# EAGLE board Uzebox Game Console V5_1 (EAGLE 9.6.2)
V1.3.0: Added Uzenet interface. ESP-12 and SPI RAM. V1.3.1: Fix for ESP-12. Added missing routing between GND and GPIO15. V1.3.2: Fix for SPI RAM instability. Connected pin7 (/HOLD) to VCC.
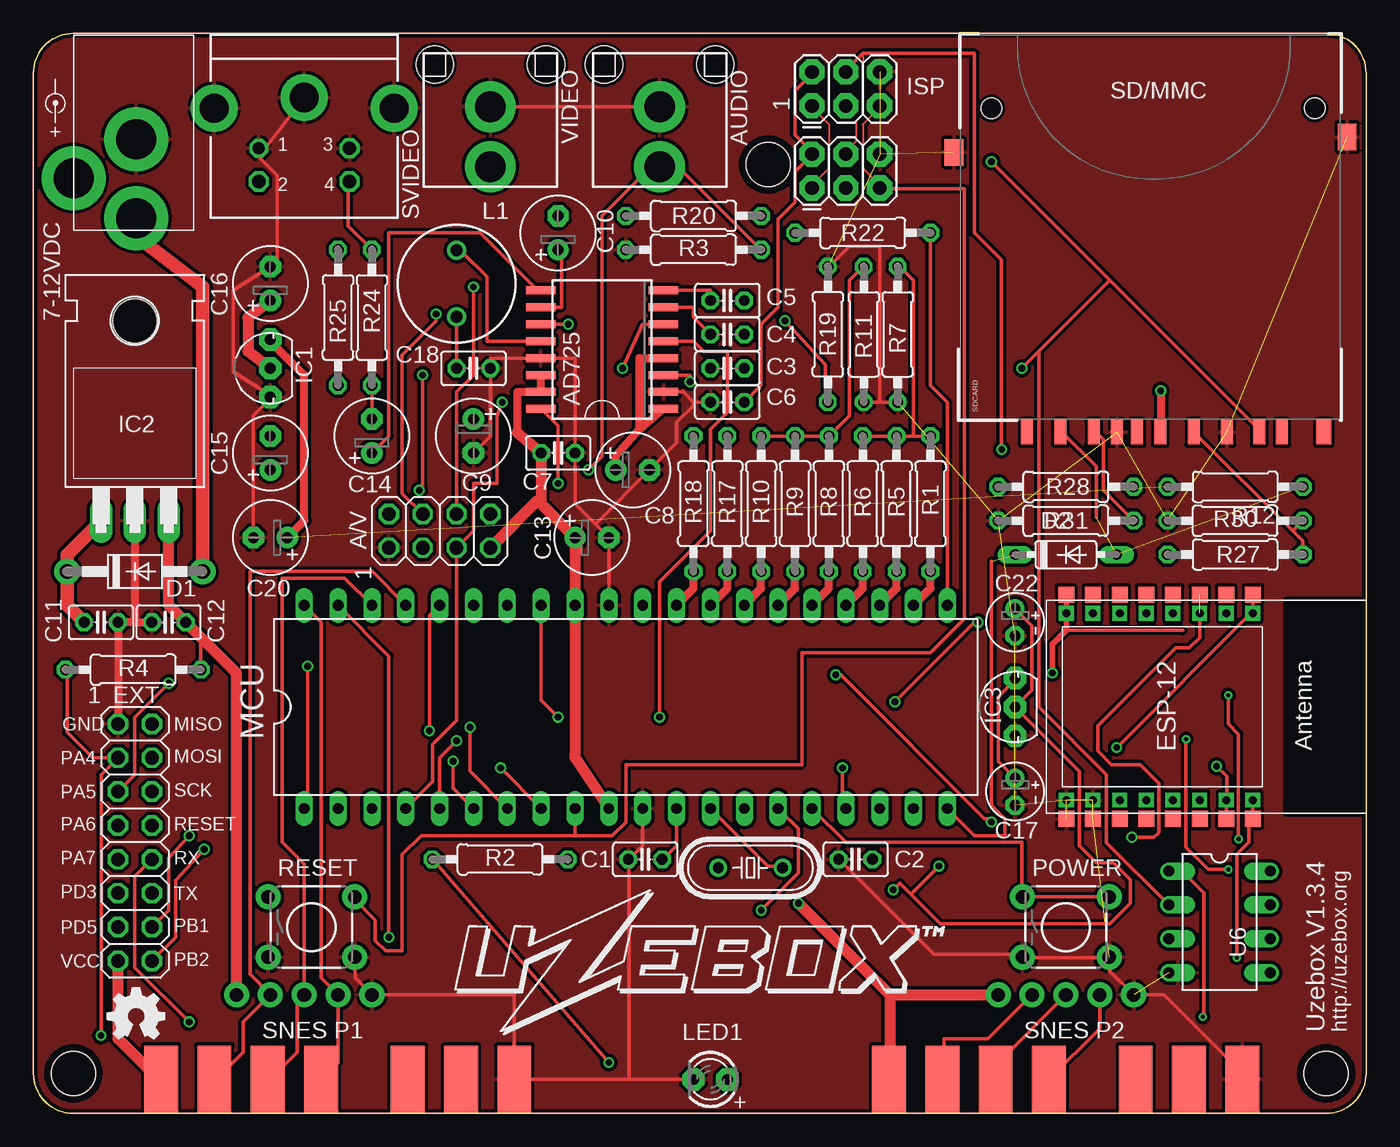
[diagram p0: board, top side]
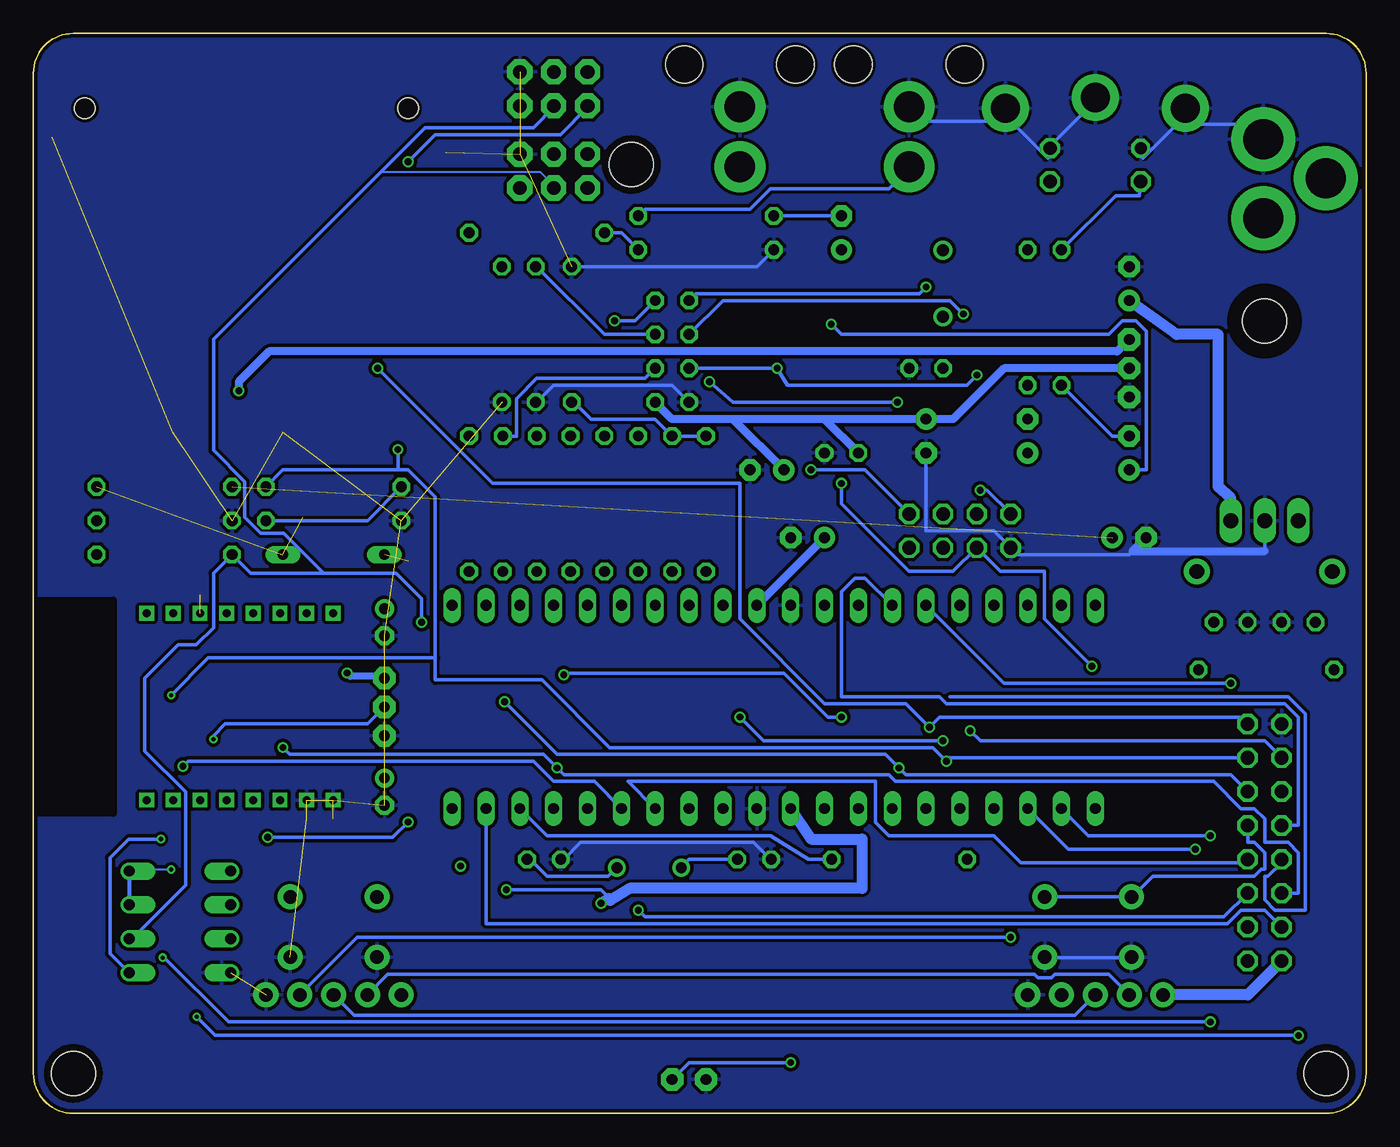
[diagram p1: board, bottom side, seen from below]

Size 100 x 81 mm. Coordinates in mm from the lower left corner, seen from the top.
Outline: 3,0 arc-90 0,3 0,78 arc-90 3,81 97,81 arc-90 100,78 100,3 arc-90 97,0 3,0
Copper layers (1*16): Top 0.035mm / dielectric 1.5mm / Bottom 0.035mm
Design rules "ITEADstudio_DRC": minimum track width 6mil, minimum drill 12mil, track to track 6mil, track to pad 6mil, pad to pad 6mil, via to via 6mil, smd to smd 0mil, copper to edge 10mil, drill to drill 10mil, minimum pad ring 10mil, minimum via ring 6mil, stop-mask expansion 2mil, vias tented up to drill 100mil, thermal gap 10mil

## Footprints (pad centres in the part's own frame; a part is rotated, then mirrored left to right if it is on the bottom)
2X04 = drill 1.016 octagon: 1 -3.81,-1.27; 2 -3.81,1.27; 3 -1.27,-1.27; 4 -1.27,1.27; 5 1.27,-1.27; 6 1.27,1.27; 7 3.81,-1.27; 8 3.81,1.27
SO16W = smd 0.6 x 2.2: 1 -4.445,-4.6; 2 -3.175,-4.6; 3 -1.905,-4.6; 4 -0.635,-4.6; 5 0.635,-4.6; 6 1.905,-4.6; 7 3.175,-4.6; 8 4.445,-4.6; 9 4.445,4.6; 10 3.175,4.6; 11 1.905,4.6; 12 0.635,4.6; 13 -0.635,4.6; 14 -1.905,4.6; 15 -3.175,4.6; 16 -4.445,4.6
RCA = drill 2.3 pad 3.81: GND 0,0; SIG 0,-4.5 | hole 2.8: -4.175,3.15; 4.175,3.15
C025-025X050 = drill 0.813 octagon: 1 -1.27,0; 2 1.27,0
E2,5-6 = drill 0.813 pad 1.6: + -1.27,0 | drill 0.813 pad 1.6 octagon: - 1.27,0
E2-4 = drill 0.813 pad 1.422: + -1.016,0 | drill 0.813 pad 1.422 octagon: - 1.016,0
DO41-10 = drill 1.118 pad 1.93: A 5.08,0; C -5.08,0
DO35-7 = drill 0.813 long: A 3.81,0; C -3.81,0
UZEBOX_ESP-12_TH = smd 1.2 x 1.2: 1 -8.4,4.5; 2 -8.4,2.5; 3 -8.4,0.5; 4 -8.4,-1.5; 5 -8.4,-3.5; 6 -8.4,-5.5; 8 -8.4,-9.5; 9 8.4,-9.5; 10 8.4,-7.5; 11 8.4,-5.5; 12 8.4,-3.5; 13 8.4,-1.5; 14 8.4,0.5; 15 8.4,2.5; 16 8.4,4.5 | smd 1.22 x 1.2: 7 -8.4,-7.5 | drill 0.6 square: P$1 -7,4.5; P$2 -7,2.5; P$3 -7,0.5; P$4 -7,-1.5; P$5 -7,-3.5; P$6 -7,-5.5; P$7 -7,-7.5; P$8 -7,-9.5; P$9 7,-9.5; P$10 7,-7.5; P$11 7,-5.5; P$12 7,-3.5; P$13 7,-1.5; P$14 7,0.5; P$15 7,2.5; P$16 7,4.5
2X08 = drill 1.016 octagon: 1 -8.89,-1.27; 2 -8.89,1.27; 3 -6.35,-1.27; 4 -6.35,1.27; 5 -3.81,-1.27; 6 -3.81,1.27; 7 -1.27,-1.27; 8 -1.27,1.27; 9 1.27,-1.27; 10 1.27,1.27; 11 3.81,-1.27; 12 3.81,1.27; 13 6.35,-1.27; 14 6.35,1.27; 15 8.89,-1.27; 16 8.89,1.27
TO92-INLINE = drill 0.813 pad 1.676 octagon: 1 -2.159,0; 2 0,0; 3 2.159,0
TO220H = drill 1.118 long: 1 -2.54,-10.16; 2 0,-10.16; 3 2.54,-10.16 | hole 3.302: 0,4.826
2X3 = drill 1.016 pad 1.88 octagon: 1 0,0; 2 0,2.54; 3 2.54,0; 4 2.54,2.54; 5 5.08,0; 6 5.08,2.54
1X05 = drill 1.016 pad 1.88: 1 0,0; 2 2.54,0; 3 5.08,0; 4 7.62,0; 5 10.16,0
6000-XXXX-RC = drill 0.9 pad 1.422: 1 -2.5,0; 2 2.5,0
LED3MM = drill 0.813 pad 1.676 octagon: A -1.27,0; K 1.27,0
DIL40 = drill 0.813 long: 1 -24.13,-7.62; 2 -21.59,-7.62; 3 -19.05,-7.62; 4 -16.51,-7.62; 5 -13.97,-7.62; 6 -11.43,-7.62; 7 -8.89,-7.62; 8 -6.35,-7.62; 9 -3.81,-7.62; 10 -1.27,-7.62; 11 1.27,-7.62; 12 3.81,-7.62; 13 6.35,-7.62; 14 8.89,-7.62; 15 11.43,-7.62; 16 13.97,-7.62; 17 16.51,-7.62; 18 19.05,-7.62; 19 21.59,-7.62; 20 24.13,-7.62; 21 24.13,7.62; 22 21.59,7.62; 23 19.05,7.62; 24 16.51,7.62; 25 13.97,7.62; 26 11.43,7.62; 27 8.89,7.62; 28 6.35,7.62; 29 3.81,7.62; 30 1.27,7.62; 31 -1.27,7.62; 32 -3.81,7.62; 33 -6.35,7.62; 34 -8.89,7.62; 35 -11.43,7.62; 36 -13.97,7.62; 37 -16.51,7.62; 38 -19.05,7.62; 39 -21.59,7.62; 40 -24.13,7.62
TACTILE-PTH = drill 1.016 pad 1.88: 1 -3.251,2.261; 2 3.251,2.261; 3 -3.251,-2.261; 4 3.251,-2.261
0207/10 = drill 0.813 octagon: 1 -5.08,0; 2 5.08,0
SDCARD_4UCONN = smd 1.8 x 0.9: 1 -1,6.77; 2 -1,4.27; 3 -1,2.52; 4 -1,-0.73; 5 -1,-3.23; 6 -1,-5.73; 7 -1,-8.15; 8 -1,-9.85; 9 -1,9.27; CD -1,1.02 | smd 2 x 1.4: SH@1 20,14.75; SH@2 21.15,-14.75 | smd 1.8 x 1.1: WP -1,-13 | hole 1.55: 23.3,11.94; 23.3,-12.32
SNES_CONNECTOR = smd 2.54 x 5.08: P$8 -12,2.54; P$9 -8,2.54; P$10 -4,2.54; P$11 0,2.54; P$12 6.5,2.54; P$13 10.5,2.54; P$14 14.5,2.54
MINIDIN4 = drill 0.9 octagon: 1 -3.4,-3.8 | drill 1 octagon: 2 3.4,-3.8; 3 -3.4,-6.3; 4 3.4,-6.3 | drill 2.2 pad 3.5: GND1 -6.75,-0.8; GND2 0,0; GND3 6.75,-0.8
PJ-102A = drill 3 pad 4.8: RING 0.1,-3.39; RING_SW -4.6,-6.29; TIP 0.1,-9.29
DIL08 = drill 0.813 offset: 1 -5.08,-5.08; 2 -2.54,-5.08; 3 0,-5.08; 4 2.54,-5.08; 5 2.54,2.54; 6 0,2.54; 7 -2.54,2.54; 8 -5.08,2.54
STAND-OFF = hole 3.302: 0,0
HC49/S = drill 0.813: 1 -2.413,0; 2 2.413,0

## Placement (x,y rotation side)
A/V  [2X04]  30.48,43.69 0 top
AD725  AD725  [SO16W]  42.67,57.28 90 top
AUDIO  RCA  [RCA]  46.99,75.5 0 top
C1  18pF  [C025-025X050]  45.91,19.05 180 top
C2  18pF  [C025-025X050]  61.69,19.05 180 top
C3  100nF  [C025-025X050]  52.07,55.88 180 top
C4  100nF  [C025-025X050]  52.07,58.42 180 top
C5  100nF  [C025-025X050]  52.07,60.96 180 top
C6  100nF  [C025-025X050]  52.07,53.34 180 top
C7  100nF  [C025-025X050]  39.37,49.53 0 top
C8  10uF  [E2,5-6]  44.96,48.26 0 top
C9  10uF  [E2,5-6]  33.02,50.8 270 top
C10  220uF  [E2,5-6]  39.37,66.04 90 top
C11  330nF  [C025-025X050]  5.08,36.83 0 top
C12  100nF  [C025-025X050]  10.16,36.83 180 top
C13  10uF  [E2,5-6]  41.91,43.18 0 top
C14  220uF  [E2,5-6]  25.4,50.8 90 top
C15  220uF  [E2,5-6]  17.78,49.53 90 top
C16  1uF  [E2,5-6]  17.78,62.23 90 top
C17  1uF  [E2-4]  73.66,24.13 270 top
C18  18pF  [C025-025X050]  33.02,55.88 0 top
C20  1uF  [E2,5-6]  17.78,43.18 180 top
C22  1uF  [E2-4]  73.66,36.83 270 top
D1  1N4001  [DO41-10]  7.62,40.64 0 top
D2  BAT85  [DO35-7]  77.47,41.91 0 top
ESP-12  ESP-12  [UZEBOX_ESP-12_TH]  87,30.5 270 top
EXT  [2X08]  7.62,20.32 270 top
IC1  MCP1700  [TO92-INLINE]  17.78,55.88 90 top
IC2  7805T  [TO220H]  7.62,54.61 0 top
IC3  MCP1700  [TO92-INLINE]  73.66,30.48 90 top
ISP  [2X3]  58.42,75.56 0 top
ISP-90DEG  (optional)  [2X3]  58.42,69.4 0 top
JP4  [1X05]  15.24,8.89 0 top
JP5  [1X05]  72.39,8.89 0 top
L1  68uH  [6000-XXXX-RC]  31.75,62.23 270 top
LED1  P607-ND  [LED3MM]  50.8,2.54 180 top
MCU  MEGA164P/324P/644P-PU  [DIL40]  44.45,30.48 0 top
POWER  USER  [TACTILE-PTH]  77.47,13.97 0 top
R1  3.16K  [0207/10]  67.31,45.72 90 top
R2  301  [0207/10]  35.02,19.05 0 top
R3  806  [0207/10]  49.53,64.77 0 top
R4  3.16K  [0207/10]  7.49,33.27 0 top
R5  1.58K  [0207/10]  64.77,45.72 90 top
R6  806  [0207/10]  62.23,45.72 90 top
R7  75  [0207/10]  64.85,58.42 270 top
R8  3.16k  [0207/10]  59.69,45.72 90 top
R9  1.58k  [0207/10]  57.15,45.72 90 top
R10  806  [0207/10]  54.61,45.72 90 top
R11  75  [0207/10]  62.31,58.42 270 top
R12  3.16K  [0207/10]  90.17,46.99 180 top
R17  1.58k  [0207/10]  52.07,45.72 90 top
R18  806  [0207/10]  49.53,45.72 90 top
R19  75  [0207/10]  59.61,58.42 90 top
R20  75  [0207/10]  49.53,67.31 0 top
R22  3.16K  [0207/10]  62.23,66.04 0 top
R24  75  [0207/10]  25.4,59.69 270 top
R25  75  [0207/10]  22.86,59.69 270 top
R27  301  [0207/10]  90.17,41.91 180 top
R28  301  [0207/10]  77.47,46.99 0 top
R30  562  [0207/10]  90.17,44.45 0 top
R31  562  [0207/10]  77.47,44.45 0 top
RESET  RESET  [TACTILE-PTH]  20.86,13.97 0 top
SDCARD  SD_CARD_SOCKET4UCON  [SDCARD_4UCONN]  83.82,52.07 90 top
SNES_P1  SNES Player 1  [SNES_CONNECTOR]  21.59,0 0 top
SNES_P2  SNES Player 2  [SNES_CONNECTOR]  76.2,0 0 top
SVIDEO  S-VIDEO OUT  [MINIDIN4]  20.32,76.18 0 top
U5  DC IN  [PJ-102A]  7.62,76.44 0 top
U6  23LC1024  [DIL08]  90.27,13.1 270 top
U$1  [OSHW_FILLX150_NOTEXT]  5.59,5.6 0 top
U$2  [STAND-OFF]  3,3 0 top
U$3  [STAND-OFF]  97,3 180 top
U$4  [STAND-OFF]  55.14,71.15 0 top
U$6  [LOGO]  40.91,12 0 top
U$7  [POWER]  1.65,76.71 270 top
U$8  [BUMPON]  5.79,59.85 0 top
U$9  [BUMPON]  6.05,5.92 0 top
U$10  [BUMPON]  96.84,6.06 0 top
U$11  [BUMPON]  93.83,73.83 0 top
VIDEO  RCA  [RCA]  34.29,75.5 0 top
XTAL  28.63636Mhz  [HC49/S]  53.8,18.41 180 top

## Library data of the parts
A/V EXT = pinhead
AD725 = ad725; IC_NO: U2
AUDIO = rca; PN: CP-1420-ND
C1 C2 C6 C7 C11 C12 C18 R1-R12 R17-R20 R22 R24 R25 R27 R28 R30 R31 = resistor
C3-C5 C8-C10 C13-C16 C20 = rcl; SPICEPREFIX: C
C17 C22 D2 LED1 = adafruit
D1 = adafruit; PN: 641-1310-1-ND
ESP-12 = Uzebox Portable V2
IC1 IC3 = adafruit; DPN: MCP1700-3302E/TO-ND
IC2 = adafruit; DPN: LM7805ACT-ND
ISP ISP-90DEG = SparkFun; PN: 609-2436-ND
JP4 JP5 U$2-U$4 = SparkFun
L1 = rcl; SPICEPREFIX: L
MCU = avr-5
POWER RESET = SparkFun; PN: P8006S-ND
SDCARD = SparkFun-Connectors
SNES_P1 SNES_P2 U6 U$6-U$11 = uzebox
SVIDEO = uzebox; PN: CP-2240-ND
U5 = adafruit; LABEL: DC IN (9-12V)
U$1 = ohw-logo
VIDEO = rca; PN: CP-1421-ND
XTAL = crystal; OC_FARNELL: 1667008; OC_NEWARK: unknown; PN: 887-1256-ND

## Nets
3V3_ESP: C17.+ ESP-12.8 ESP-12.P$8 IC3.3
+3V3: C20.+ IC1.3 R12.2 SDCARD.4
+5V: A/V.7 AD725.1 AD725.4 AD725.14 AD725.15 C6.1 C7.1 C8.+ C9.+ C12.1 C13.+ C16.+ C22.+ EXT.15 IC1.2 IC2.3 IC3.2 ISP-90DEG.2 ISP.2 JP4.1 JP5.1 MCU.10 MCU.30 MCU.32 R4.2 SNES_P1.P$8 SNES_P2.P$8 U6.7 U6.8
AUDIO: A/V.8 AUDIO.SIG R3.2 R22.1
BLUE: A/V.6 AD725.8 C5.2
BLUE1: MCU.28 R17.1
BLUE2: MCU.29 R18.1
ESP_EN: ESP-12.3 ESP-12.P$3 MCU.33
ESP_PROG: EXT.9
ESP_RST: ESP-12.1 ESP-12.P$1 EXT.11 MCU.17
GND: A/V.1 AD725.2 AD725.13 AUDIO.GND C1.2 C2.2 C6.2 C7.2 C8.- C9.- C11.2 C12.2 C13.- C16.- C17.- C18.2 C20.- C22.- ESP-12.9 ESP-12.10 ESP-12.P$9 ESP-12.P$10 EXT.1 IC1.1 IC2.2 IC3.1 ISP-90DEG.6 ISP.6 JP4.5 JP5.5 LED1.K MCU.11 MCU.31 POWER.3 POWER.4 R3.1 R7.2 R11.2 R19.2 R30.1 R31.1 RESET.3 RESET.4 SDCARD.3 SDCARD.6 SDCARD.SH@1 SDCARD.SH@2 SNES_P1.P$14 SNES_P2.P$14 SVIDEO.1 SVIDEO.2 SVIDEO.GND1 SVIDEO.GND2 SVIDEO.GND3 U5.RING U6.4 VIDEO.GND
GREEN: A/V.4 AD725.7 C4.2
GREEN0: MCU.25 R8.1
GREEN1: MCU.26 R9.1
GREEN2: MCU.27 R10.1
MISO: EXT.2 ISP-90DEG.1 ISP.1 MCU.7 SDCARD.7 U6.2
MOSI: EXT.4 ISP-90DEG.4 ISP.4 MCU.6 R28.2 U6.5
MOSI_3V3: R28.1 R31.2 SDCARD.2
N$1: AD725.12 L1.1
N$2: C18.1 L1.2
N$3: C5.1 R17.2 R18.2 R19.1
N$4: C4.1 R8.2 R9.2 R10.2 R11.1
N$5: C3.1 R1.2 R5.2 R6.2 R7.1
N$6: C10.- R20.1
N$7: AD725.10 C10.+
N$8: R20.2 VIDEO.SIG
N$9: C1.1 MCU.12 XTAL.2
N$10: D1.A U5.TIP
N$11: C14.- R24.2
N$12: C2.1 MCU.13 XTAL.1
N$13: MCU.21 R22.2
N$14: U6.3
N$20: C11.1 D1.C IC2.1
N$23: MCU.18 R2.2
N$25: LED1.A R2.1
N$26: C15.- R25.2
N$28: AD725.11 C15.+
N$29: AD725.9 C14.+
N$30: R24.1 SVIDEO.4
N$31: R25.1 SVIDEO.3
PA5: EXT.5 MCU.35
PA6: EXT.7 MCU.34
PB1: EXT.14 MCU.2
PB2: EXT.16 MCU.3
PD5: EXT.13 MCU.19
POWER_SW: MCU.16 POWER.1 POWER.2
RED: A/V.2 AD725.6 C3.2
RED0: MCU.22 R1.1
RED1: MCU.23 R5.1
RED2: MCU.24 R6.1
RESET: EXT.8 ISP-90DEG.5 ISP.5 MCU.9 RESET.1 RESET.2
SCK: EXT.6 ISP-90DEG.3 ISP.3 MCU.8 R27.2 U6.6
SCK_3V3: R27.1 R30.2 SDCARD.5
SD_CE: D2.C MCU.20
SD_CE_3V3: D2.A R12.1 SDCARD.1
SNES_CLK: JP4.2 JP5.2 MCU.37 SNES_P1.P$9 SNES_P2.P$9
SNES_DATA1: JP4.4 MCU.40 SNES_P1.P$11
SNES_DATA2: JP5.4 MCU.39 SNES_P2.P$11
SNES_LATCH: JP4.3 JP5.3 MCU.38 SNES_P1.P$10 SNES_P2.P$10
SPIRAM_EN: EXT.3 MCU.36 R4.1 U6.1
UART_RX: ESP-12.16 ESP-12.P$16 EXT.10 MCU.14
UART_TX: ESP-12.15 ESP-12.P$15 EXT.12 MCU.15
VIDEO_CE: AD725.5 MCU.5
VIDEO_CLK: A/V.5 AD725.3 MCU.4
VIDEO_SYNC: A/V.3 AD725.16 MCU.1

## Tracks (layer width: path | path; a pad name or v marks a point on that pad's centre or on a via)
3V3_ESP  (via drill 0.51)
  Top 0.254: C17.+ 72.39,26.42 72.39,31.24 73.66,32.51 IC3.3 | 86.22,36.23 77.5,36.23
  Top 0.406: v76.45,33.02 76.45,35.18 77.5,36.23 ESP-12.P$8 ESP-12.8
  Bottom 0.254: 76.2,32.77 v76.45,33.02 | 73.66,32.77 IC3.3
  Bottom 0.508: 73.66,32.77 76.2,32.77
+3V3  (via drill 0.51)  (1 unrouted)
  Top 0.254: 17.78,57.91 IC1.3 | 84.58,51.31 SDCARD.4
  Top 0.61: C20.+ 20.32,44.45 20.32,55.37 17.78,57.91 | v84.58,54.2 84.58,51.31
  Bottom 0.61: IC1.3 18.67,57.15 82.3,57.15 84.58,54.86 v84.58,54.2
+5V  (via drill 0.3, 0.51)
  Top 0.152: 58.42,71.88 ISP-90DEG.2 58.42,72.14
  Top 0.254: 64.26,2.54 SNES_P2.P$8 | SNES_P1.P$8 9.4,2.54 | AD725.15 38.1,54.1 | 38.1,55.37 AD725.14 | 47.24,52.83 AD725.1 | C6.1 54.61,54.61 54.61,59.18 55.88,60.45 55.88,67.06 57.15,68.33 57.15,70.61 58.42,71.88 | ISP.2 58.42,77.98 57.15,76.71 57.15,73.41 58.42,72.14 | 40.64,26.92 40.64,26.67 | 38.1,45.97 37.85,45.97 | v64.52,16.76 65.02,17.27 65.85,16.45 | 65.85,16.45 v67.94,18.54 | C22.+ 74.93,36.58 74.93,31.75 IC3.2 78.49,25.65 78.49,20.07 79.76,18.8 81.03,18.8 82.3,17.53 82.3,15.75 80.77,14.22 68.07,14.22 65.85,16.45 | v89.66,18.29 88.14,18.29 86.49,19.94 v86.49,28.07 | R4.2 12.57,35.69 C12.1
  Top 0.61: 38.1,54.1 38.1,55.37 | 36.32,51.05 36.32,54.1 AD725.15 | 45.47,51.31 43.69,49.28 C8.+ | 45.47,51.31 47.24,52.83 | 45.47,51.31 45.47,56.64 AD725.4
  Top 0.813: 64.26,8.89 JP5.1 | 64.26,8.89 64.26,2.54 | 40.64,26.67 MCU.10 | v57.4,15.75 64.26,8.89 | 9.4,2.54 6.35,5.59 EXT.15 | IC2.3 10.16,38.1 C12.1 15.24,33.02 JP4.1 | C16.+ 16.1,59.69 16.1,57.15 IC1.2 | 36.32,51.05 C7.1 38.1,45.97 38.1,45.72 C13.+ MCU.32 40.64,26.92 | 37.85,45.97 A/V.7
  Bottom 0.152: U6.8 92.68,18.18 92.57,18.29 v89.66,18.29
  Bottom 0.254: v64.52,16.76 57.4,16.76 56.9,16.26 56.81,16.12 56.72,15.98 | IC3.2 74.93,29.21 85.6,29.21 86.49,28.32 v86.49,28.07
  Bottom 0.305: U6.8 U6.7
  Bottom 0.61: C6.1 52.07,52.07 47.5,52.07 | 47.5,52.07 C8.+ | 40.64,52.07 47.5,52.07 | 40.64,52.07 C9.+ 30.99,52.07 27.18,55.88 IC1.2 | 40.64,52.07 C7.1 | C13.+ MCU.30
  Bottom 0.813: 56.72,15.98 55.27,16.88 37.83,16.88 37.83,20.57 41.64,20.57 MCU.10 | 56.81,16.12 v57.4,15.75 | EXT.15 8.89,8.89 JP4.1 | IC2.3 10.16,46.16 11.1,47 11.1,58.42 14.24,58.42 C16.+
AUDIO  (via drill 0.51)
  Top 0.254: v41.66,48.26 42.67,49.28 42.67,67.31 46.99,71.63 AUDIO.SIG 46.99,71.37 48.01,71.37 R3.2
  Bottom 0.254: R3.2 55.88,66.04 R22.1 | v41.66,48.26 37.59,48.26 A/V.8
BLUE  (via drill 0.51)
  Top 0.254: AD725.8 50.8,61.72 C5.2 | A/V.6 31.75,54.1 33.02,55.37 v33.02,61.98
  Bottom 0.254: v33.02,61.98 33.53,61.47 50.29,61.47 C5.2
BLUE1
  Top 0.61: MCU.28 52.07,39.37 R17.1
BLUE2
  Top 0.61: MCU.29 49.53,39.37 R18.1
ESP_EN  (via drill 0.51)  (1 unrouted)
  Top 0.152: 84.39,21.02 84.45,21.08
  Top 0.254: 84.39,21.02 84.07,20.7 v82.42,20.7 | v60.2,32.89 60.58,32.89 71.37,22.1 71.63,22.1 v71.88,21.84 | v39.37,29.72 38.1,30.99 MCU.33 | 84.45,21.08 84.45,24.77 83.06,26.16 80.9,26.16 79.88,27.18 79.88,29.08 85.72,34.92 86.74,34.92 87.5,35.68 ESP-12.P$3
  Bottom 0.254: v82.42,20.7 73.03,20.7 v71.88,21.84 | v60.2,32.89 60.07,33.02 43.69,33.02 40.39,29.72 v39.37,29.72
ESP_PROG
  Bottom 0.254: 31.24,31.24 5.84,31.24 4.57,29.97 4.57,15.24 6.86,15.24 7.62,16 7.62,17.78 7.37,17.78 6.35,18.8 EXT.9
ESP_RST  (via drill 0.51)
  Top 0.254: MCU.17 60.71,23.11 v60.71,25.91 | v81.28,27.43 91.35,37.5 ESP-12.P$1 ESP-12.1
  Bottom 0.254: EXT.11 5.08,16.51 5.08,19.56 5.84,20.32 7.62,20.32 7.62,22.1 8.38,22.86 9.4,22.86 11.43,24.89 35.31,24.89 35.81,25.4 60.2,25.4 v60.71,25.91 61.72,26.92 80.77,26.92 v81.28,27.43
GND  (17 unrouted)
  Top 0.254: C9.- 34.29,50.8 C18.2 34.29,56.64 AD725.13 40.64,56.64 C7.2 40.64,45.72 42.16,44.2 | MCU.31 C13.- 42.16,44.2 | 42.16,44.2 C8.- 48.26,50.29 48.26,51.82 49.53,53.09 49.53,53.34 | R7.2 63.5,53.34 | 63.5,53.34 R11.2 | AD725.2 48.77,54.1 49.53,53.34 | C6.2 49.53,53.34 | 63.5,53.34 63.5,65.02 61.21,65.02 59.69,63.5 R19.2 | C20.- 16.51,52.32 17.78,53.59 IC1.1 17.78,53.85 15,55.63 15,61.72 C16.- 18.29,64.01 18.29,70.36 17.02,71.63 | SVIDEO.GND2 17.02,71.88 17.02,71.63 | VIDEO.GND AUDIO.GND | 44.7,19.05 45.72,20.07 MCU.11 | RESET.4 24.13,11.68 24.13,10.16 JP4.5 36.07,8.89 36.07,2.54 SNES_P1.P$14 44.7,2.54 | 44.7,2.54 LED1.K | 44.7,2.54 44.7,19.05 | 44.7,19.05 C1.2 | SNES_P2.P$14 90.68,2.54 90.42,2.79 90.42,3.3 84.84,8.89 JP5.5 80.77,10.67 80.77,11.68 POWER.4 80.52,11.68 74.42,11.68 POWER.3 74.17,11.94 67.56,11.94 60.45,19.05 C2.2 | 17.02,71.63 SVIDEO.1
  Top 0.61: 7.62,36.83 C12.2 | 7.62,36.83 C11.2 EXT.1 | IC2.2 7.62,36.83
  Bottom 0.254: R3.1 45.72,63.5 R19.2 | C6.2 52.07,54.61 60.96,54.61 62.23,53.34 R11.2 | 17.53,42.16 17.78,41.91 26.16,41.91 A/V.1 27.94,43.69 33.02,43.69 C9.- | 7.62,42.16 IC2.2 | SVIDEO.1 16.76,71.63 14.22,74.17 13.72,74.17 SVIDEO.GND1 13.46,74.17 9.4,74.17 7.37,72.14 U5.RING | VIDEO.GND 32.77,74.42 27.18,74.42 SVIDEO.GND3 26.92,74.17 26.42,74.17 23.88,71.63 SVIDEO.2 23.88,72.39 20.32,75.95 SVIDEO.GND2 | C2.2 60.2,19.05 58.93,20.32 45.97,20.32 44.7,19.05 C1.2 | RESET.3 17.78,11.68 23.88,11.68 RESET.4
  Bottom 0.61: C20.- 17.53,42.16 7.62,42.16
  pour Top (isolate 0.254): 0,78 arc-90 3,81 97,81 arc-90 100,78 100,3 arc-90 97,0 3,0 arc-90 0,3
  pour Bottom (isolate 0.254): 0,78 arc-90 3,81 97,81 arc-90 100,78 100,3 arc-90 97,0 3,0 arc-90 0,3
GREEN  (via drill 0.51)
  Top 0.254: AD725.7 49.53,60.45 49.53,59.69 C4.2 | A/V.4 27.69,46.48 27.69,56.9 30.23,59.44 v30.23,59.94
  Bottom 0.254: v30.23,59.94 31.24,60.96 48.26,60.96 C4.2
GREEN0
  Top 0.61: MCU.25 59.69,39.37 R8.1
GREEN1
  Top 0.61: MCU.26 57.15,39.37 R9.1
GREEN2
  Top 0.61: MCU.27 54.61,39.37 R10.1
MISO  (via drill 0.51)
  Top 0.152: ISP-90DEG.1 58.42,69.6 59.69,70.87 59.69,74.17 58.42,75.44 ISP.1
  Top 0.254: MCU.7 32.77,25.65 v32.77,28.96 | v71.88,71.37 80.77,62.48 | 80.77,62.48 91.95,51.31 SDCARD.7 | 80.77,62.48 75.44,57.15 | 75.44,57.15 v74.17,55.88 | 75.44,57.15 75.44,32.77 75.44,30.48 80.52,25.4 80.52,21.08 80.52,20.31 U6.2
  Bottom 0.254: ISP.1 58.42,75.44 60.45,73.41 69.85,73.41 v71.88,71.37 | EXT.2 9.4,29.72 32,29.72 v32.77,28.96 34.54,30.73 40.64,30.73 46.99,37.08 46.99,47.24 65.53,47.24 v74.17,55.88
MOSI  (via drill 0.3, 0.51)
  Top 0.152: 62.23,79.5 62.23,74.93 61.72,74.42 61.72,72.9 60.96,72.14 ISP-90DEG.4
  Top 0.254: MCU.6 31.5,24.38 v31.5,26.42 | v72.64,49.78 72.64,64.01 70.61,66.04 70.61,79.5 62.23,79.5 60.96,78.23 ISP.4 | v89.66,31.37 89.66,29.21 90.42,28.45 v90.42,20.57
  Bottom 0.254: EXT.4 31.24,26.67 v31.5,26.42 32.51,27.43 56.77,27.43 61.85,32.51 69.85,32.51 69.85,34.16 | 72.64,48.26 71.88,48.26 69.85,46.23 69.85,34.16 | 72.64,48.26 v72.64,49.78 | v89.66,31.37 86.87,34.16 69.85,34.16 | R28.2 81.28,48.26 72.64,48.26 | v90.42,20.57 92.84,20.57 94.23,19.18 94.23,11.98 U6.5
MOSI_3V3
  Top 0.254: R31.2 80.26,46.74 80.26,50.55 79.76,51.05 SDCARD.2
  Bottom 0.254: R28.1 74.93,44.45 R31.2
N$1
  Top 0.254: AD725.12 34.04,57.91 34.04,62.74 32.26,64.52 31.75,64.52 L1.1
N$2
  Top 0.254: C18.1 L1.2
N$3  (via drill 0.51)
  Top 0.254: v56.39,59.44 59.44,56.13 59.44,53.34 R19.1
  Bottom 0.254: R18.2 R17.2 53.34,52.07 58.17,52.07 59.44,53.34 R19.1 | C5.1 54.86,59.44 v56.39,59.44
N$4
  Top 0.254: R10.2 R9.2 R8.2 61.21,52.32 61.21,62.48 62.23,63.5 R11.1
  Bottom 0.254: C4.1 57.15,58.42 62.23,63.5 R11.1
N$5
  Top 0.254: R6.2 R5.2 66.04,50.8 | 66.04,50.8 R1.2 | 66.04,50.8 66.04,62.48 65.02,63.5 R7.1
  Bottom 0.254: C3.1 54.1,55.12 62.23,55.12 63.75,53.59 63.75,50.8 R5.2
N$6
  Bottom 0.254: C10.- R20.1
N$7
  Top 0.254: AD725.10 39.62,60.45 39.62,64.52 C10.+
N$8
  Bottom 0.254: R20.2 54.1,67.82 46.23,67.82 44.7,69.34 35.81,69.34 34.29,70.87 VIDEO.SIG
N$9
  Top 0.254: MCU.12 48.26,20.07 47.24,19.05 C1.1
  Bottom 0.254: C1.1 50.8,19.05 51.31,18.54 XTAL.2
N$10
  Top 0.254: 7.37,66.04 U5.TIP
  Top 1.016: D1.A 12.7,61.98 7.37,66.04
N$11
  Top 0.254: C14.- R24.2
N$12
  Top 0.254: MCU.13 55.12,18.54 56.13,18.54 XTAL.1
  Bottom 0.254: C2.1 62.74,19.05 61.47,17.78 56.9,17.78 56.39,18.29 XTAL.1
N$13
  Top 0.254: MCU.21 68.58,53.34 67.31,54.61 R22.2
N$20
  Top 1.016: C11.1 2.54,38.1 D1.C 2.54,41.91 IC2.1
N$23
  Bottom 0.254: R2.2 41.86,19.05 44.69,20.81 44.7,20.83 61.47,20.83 MCU.18
N$25  (via drill 0.51)
  Top 0.254: R2.1 v43.18,3.81
  Bottom 0.254: v43.18,3.81 50.8,3.81 LED1.A
N$26
  Bottom 0.254: R25.2 19.05,50.8 C15.-
N$28  (via drill 0.51)
  Top 0.254: v40.13,59.18 AD725.11
  Bottom 0.254: v40.13,59.18 39.37,58.42 19.3,58.42 18.29,59.44 17.27,59.44 16.51,58.67 16.51,48.26 C15.+
N$29
  Top 0.254: C14.+ 26.67,50.8 26.67,66.04 33.53,66.04 37.85,61.72 AD725.9
N$30
  Top 0.254: R24.1 23.62,66.55 23.62,69.85 SVIDEO.4
N$31
  Bottom 0.254: R25.1 18.8,68.83 17.02,68.83 SVIDEO.3
PA5  (via drill 0.51)
  Top 0.254: v10.16,32.26 7.62,29.72 7.62,25.4 EXT.5
  Bottom 0.254: MCU.35 27.18,32.26 v10.16,32.26
PA6
  Bottom 0.254: MCU.34 37.59,40.13 38.35,40.13 39.37,39.12 39.37,31.24 32,31.24 31.5,30.73 6.1,30.73 5.08,29.72 5.08,21.59 EXT.7
PB1  (via drill 0.51)
  Top 0.254: v11.68,20.83 10.16,19.16 10.16,15.24 EXT.14
  Bottom 0.254: MCU.2 20.83,20.83 v11.68,20.83
PB2  (via drill 0.51)
  Top 0.254: v12.83,19.81 10.67,17.49 10.67,13.21 EXT.16
  Bottom 0.254: MCU.3 22.35,19.81 v12.83,19.81
PD5
  Bottom 0.254: MCU.19 66.04,14.22 10.41,14.22 9.4,15.24 7.62,15.24 EXT.13
POWER_SW
  Top 0.254: MCU.16 60.96,20.32 74.17,20.32 74.17,16.26 POWER.1 74.42,16.26 80.52,16.26 POWER.2
RED  (via drill 0.51)
  Top 0.254: AD725.6 45.72,59.18 v44.2,55.88 | v29.21,55.37 29.21,46.99 v28.96,46.74
  Bottom 0.254: C3.2 v44.2,55.88 43.43,54.61 29.97,54.61 v29.21,55.37 | A/V.2 28.45,46.74 v28.96,46.74
RED0
  Top 0.61: MCU.22 67.31,39.37 R1.1
RED1
  Top 0.61: MCU.23 64.77,39.37 R5.1
RED2
  Top 0.61: MCU.24 62.23,39.37 R6.1
RESET
  Top 0.152: ISP.5 63.5,75.44 62.23,74.17 62.23,70.87 63.5,69.6 ISP-90DEG.5 63.5,69.34
  Top 0.254: 40.64,20.83 43.43,20.83 44.45,21.84 44.45,26.16 57.66,26.16 57.66,34.54 67.31,34.54 69.85,37.08 69.85,69.34 63.5,69.34 | 40.64,20.83 MCU.9 | 40.64,20.83 29.08,20.83 27.69,19.43 27.69,12.19 26.42,12.19 25.65,12.95 25.65,14.48 24.13,16 RESET.2
  Bottom 0.254: EXT.8 8.89,20.32 8.38,20.32 7.62,19.56 7.62,18.29 7.87,18.29 8.38,17.78 16,17.78 17.53,16.26 RESET.1 17.78,16.26 23.88,16.26 RESET.2
SCK  (via drill 0.51)
  Top 0.254: v35.05,25.91 MCU.8 | v70.87,36.83 70.61,36.83 v64.64,30.86
  Bottom 0.152: 73.91,70.61 61.98,70.61 60.96,69.6 ISP-90DEG.3
  Bottom 0.254: EXT.6 10.16,25.4 34.54,25.4 v35.05,25.91 36.07,26.92 60.71,26.92 v64.64,30.86 | ISP.3 60.96,75.44 62.48,73.91 70.61,73.91 73.91,70.61 86.49,58.04 86.49,49.72 84.15,47.38 84.15,44.72 82.94,43.51 81.23,43.51 78.23,40.51 | v70.87,36.83 70.87,38.61 72.77,40.51 78.23,40.51 | 78.23,40.51 83.69,40.51 R27.2 86.49,40.51 86.49,36.41 87.77,35.13 89.14,35.13 91.64,32.63 91.64,27.17 88.57,24.1 88.57,17.1 92.57,13.1 U6.6
SCK_3V3
  Top 0.254: 94.49,43.69 95.25,42.93 R27.1 | 94.49,43.69 87.12,51.05 SDCARD.5 | 94.49,43.69 R30.2
SD_CE  (1 unrouted)
  Top 0.254: MCU.20 70.61,20.83 72.9,20.83 72.9,22.1 71.88,23.11 71.88,41.4
SD_CE_3V3  (2 unrouted)
  Top 0.254: 79.76,44.7 79.76,48.51 77.22,51.05 SDCARD.1
SNES_CLK
  Top 0.254: JP5.2 71.63,5.59 68.33,5.59 68.33,2.54 SNES_P2.P$9 | MCU.37 25.4,40.64 16.26,40.64 16.26,10.41 JP4.2 15.75,6.86 15.75,4.57 13.72,2.54 SNES_P1.P$9
  Bottom 0.254: JP5.2 73.41,10.41 24.89,10.41 24.64,10.16 23.62,10.16 23.37,10.41 19.3,10.41 JP4.2
SNES_DATA1
  Top 0.254: MCU.40 21.59,36.83 21.59,10.16 JP4.4 22.86,3.81 SNES_P1.P$11
SNES_DATA2  (via drill 0.51)
  Top 0.254: MCU.39 26.67,34.29 v26.67,13.21 | SNES_P2.P$11 80.01,6.35 JP5.4
  Bottom 0.254: v26.67,13.21 75.69,13.21 JP5.4
SNES_LATCH
  Top 0.254: JP5.3 72.39,3.81 72.39,2.54 SNES_P2.P$10 | MCU.38 23.37,40.13 18.67,40.13 18.67,20.32 20.32,18.67 JP4.3 19.81,9.4 19.81,4.57 17.78,2.54 SNES_P1.P$10
  Bottom 0.254: JP5.3 75.95,7.37 21.84,7.37 JP4.3
SPIRAM_EN  (via drill 0.3, 0.51)
  Top 0.254: MCU.36 29.72,37.34 v29.72,28.7 | v5.08,5.84 5.08,25.4 EXT.3 4.45,26.67 2.54,28.57 2.54,33.15 R4.1 | v87.76,7.24 87.83,7.31 87.83,16.53 86.19,18.18 U6.1
  Bottom 0.254: v29.72,28.7 28.96,27.94 7.62,27.94 EXT.3 | v5.08,5.84 86.36,5.84 v87.76,7.24
UART_RX  (via drill 0.3, 0.51)
  Top 0.152: ESP-12.16 91.5,22.03 91.19,21.72
  Top 0.254: v11.68,6.86 7.62,10.92 7.62,17.78 EXT.10 | 91.19,21.72 91.19,20.32 90.3,19.43 v90.3,11.68 | ESP-12.16 ESP-12.P$16
  Bottom 0.254: MCU.14 55.37,24.89 36.83,24.89 36.83,21.84 35.81,20.83 27.94,20.83 25.91,18.8 9.14,18.8 EXT.10 | v11.68,6.86 85.34,6.86 90.17,11.68 v90.3,11.68
UART_TX  (via drill 0.51)
  Top 0.254: MCU.15 57.4,21.34 57.4,18.03 v54.61,15.24 | v88.77,26.04 89.53,25.27 89.53,23.54 ESP-12.P$15 ESP-12.15
  Bottom 0.254: v54.61,15.24 54.1,14.73 10.67,14.73 EXT.12 | v88.77,26.04 88.39,26.42 62.48,26.42 60.96,24.89 57.91,24.89 MCU.15
VIDEO_CE  (via drill 0.51)
  Top 0.254: AD725.5 49.53,57.91 50.29,57.15 52.07,57.15 52.07,52.58 50.8,51.31 50.8,43.69 46.99,39.88 v46.99,29.72 | v31.75,27.94 30.48,26.67 MCU.5
  Bottom 0.254: v46.99,29.72 45.21,27.94 v31.75,27.94
VIDEO_CLK  (via drill 0.51)
  Top 0.254: AD725.3 49.28,55.37 v49.28,54.86 | v35.18,53.34 34.8,52.32 34.8,47.24 33.02,47.24 33.02,43.69 A/V.5 31.75,29.46 29.97,27.69 29.97,24.89 MCU.4
  Bottom 0.254: v49.28,54.86 47.5,53.34 v35.18,53.34
VIDEO_SYNC  (via drill 0.51)
  Top 0.254: v39.37,47.24 39.37,51.56 38.1,52.83 AD725.16 | MCU.1 20.57,23.11 v20.57,33.53
  Bottom 0.254: v20.57,33.53 24.13,37.08 24.13,40.64 27.43,40.64 A/V.3 30.99,40.64 34.29,40.64 39.37,45.72 v39.37,47.24

## Text on the board
tPlace: SD/MMC | 1 | 7-12VDC | 1 | 1 | 1 | GND | MISO | PA4 | MOSI | PA5 | SCK | PA6 | RESET | PA7 | RX | PD3 | TX | PB1 | PD5 | VCC | PB2 | SNES P1 | SNES P2 | Uzebox V1.3.4 | http://uzebox.org